# Altium PCB DAP-PCB-REV-4.PcbDoc (part 4 of 4)
Units mil, origin at the board's own origin, x right, y up, seen from the top; angles counter-clockwise.
Board outline 2559.06 x 2559.06 mil, 6 copper layers (L1 (SIG/PWR), L2 (GND), L3 (SIG), L4 (PWR), L5 (GND), L6 (SIG/PWR)), stack 64.976 mil thick; 309 components, 179 nets, 965 pads, 300 vias.
Unrouted connection lines stored in the file: 157.
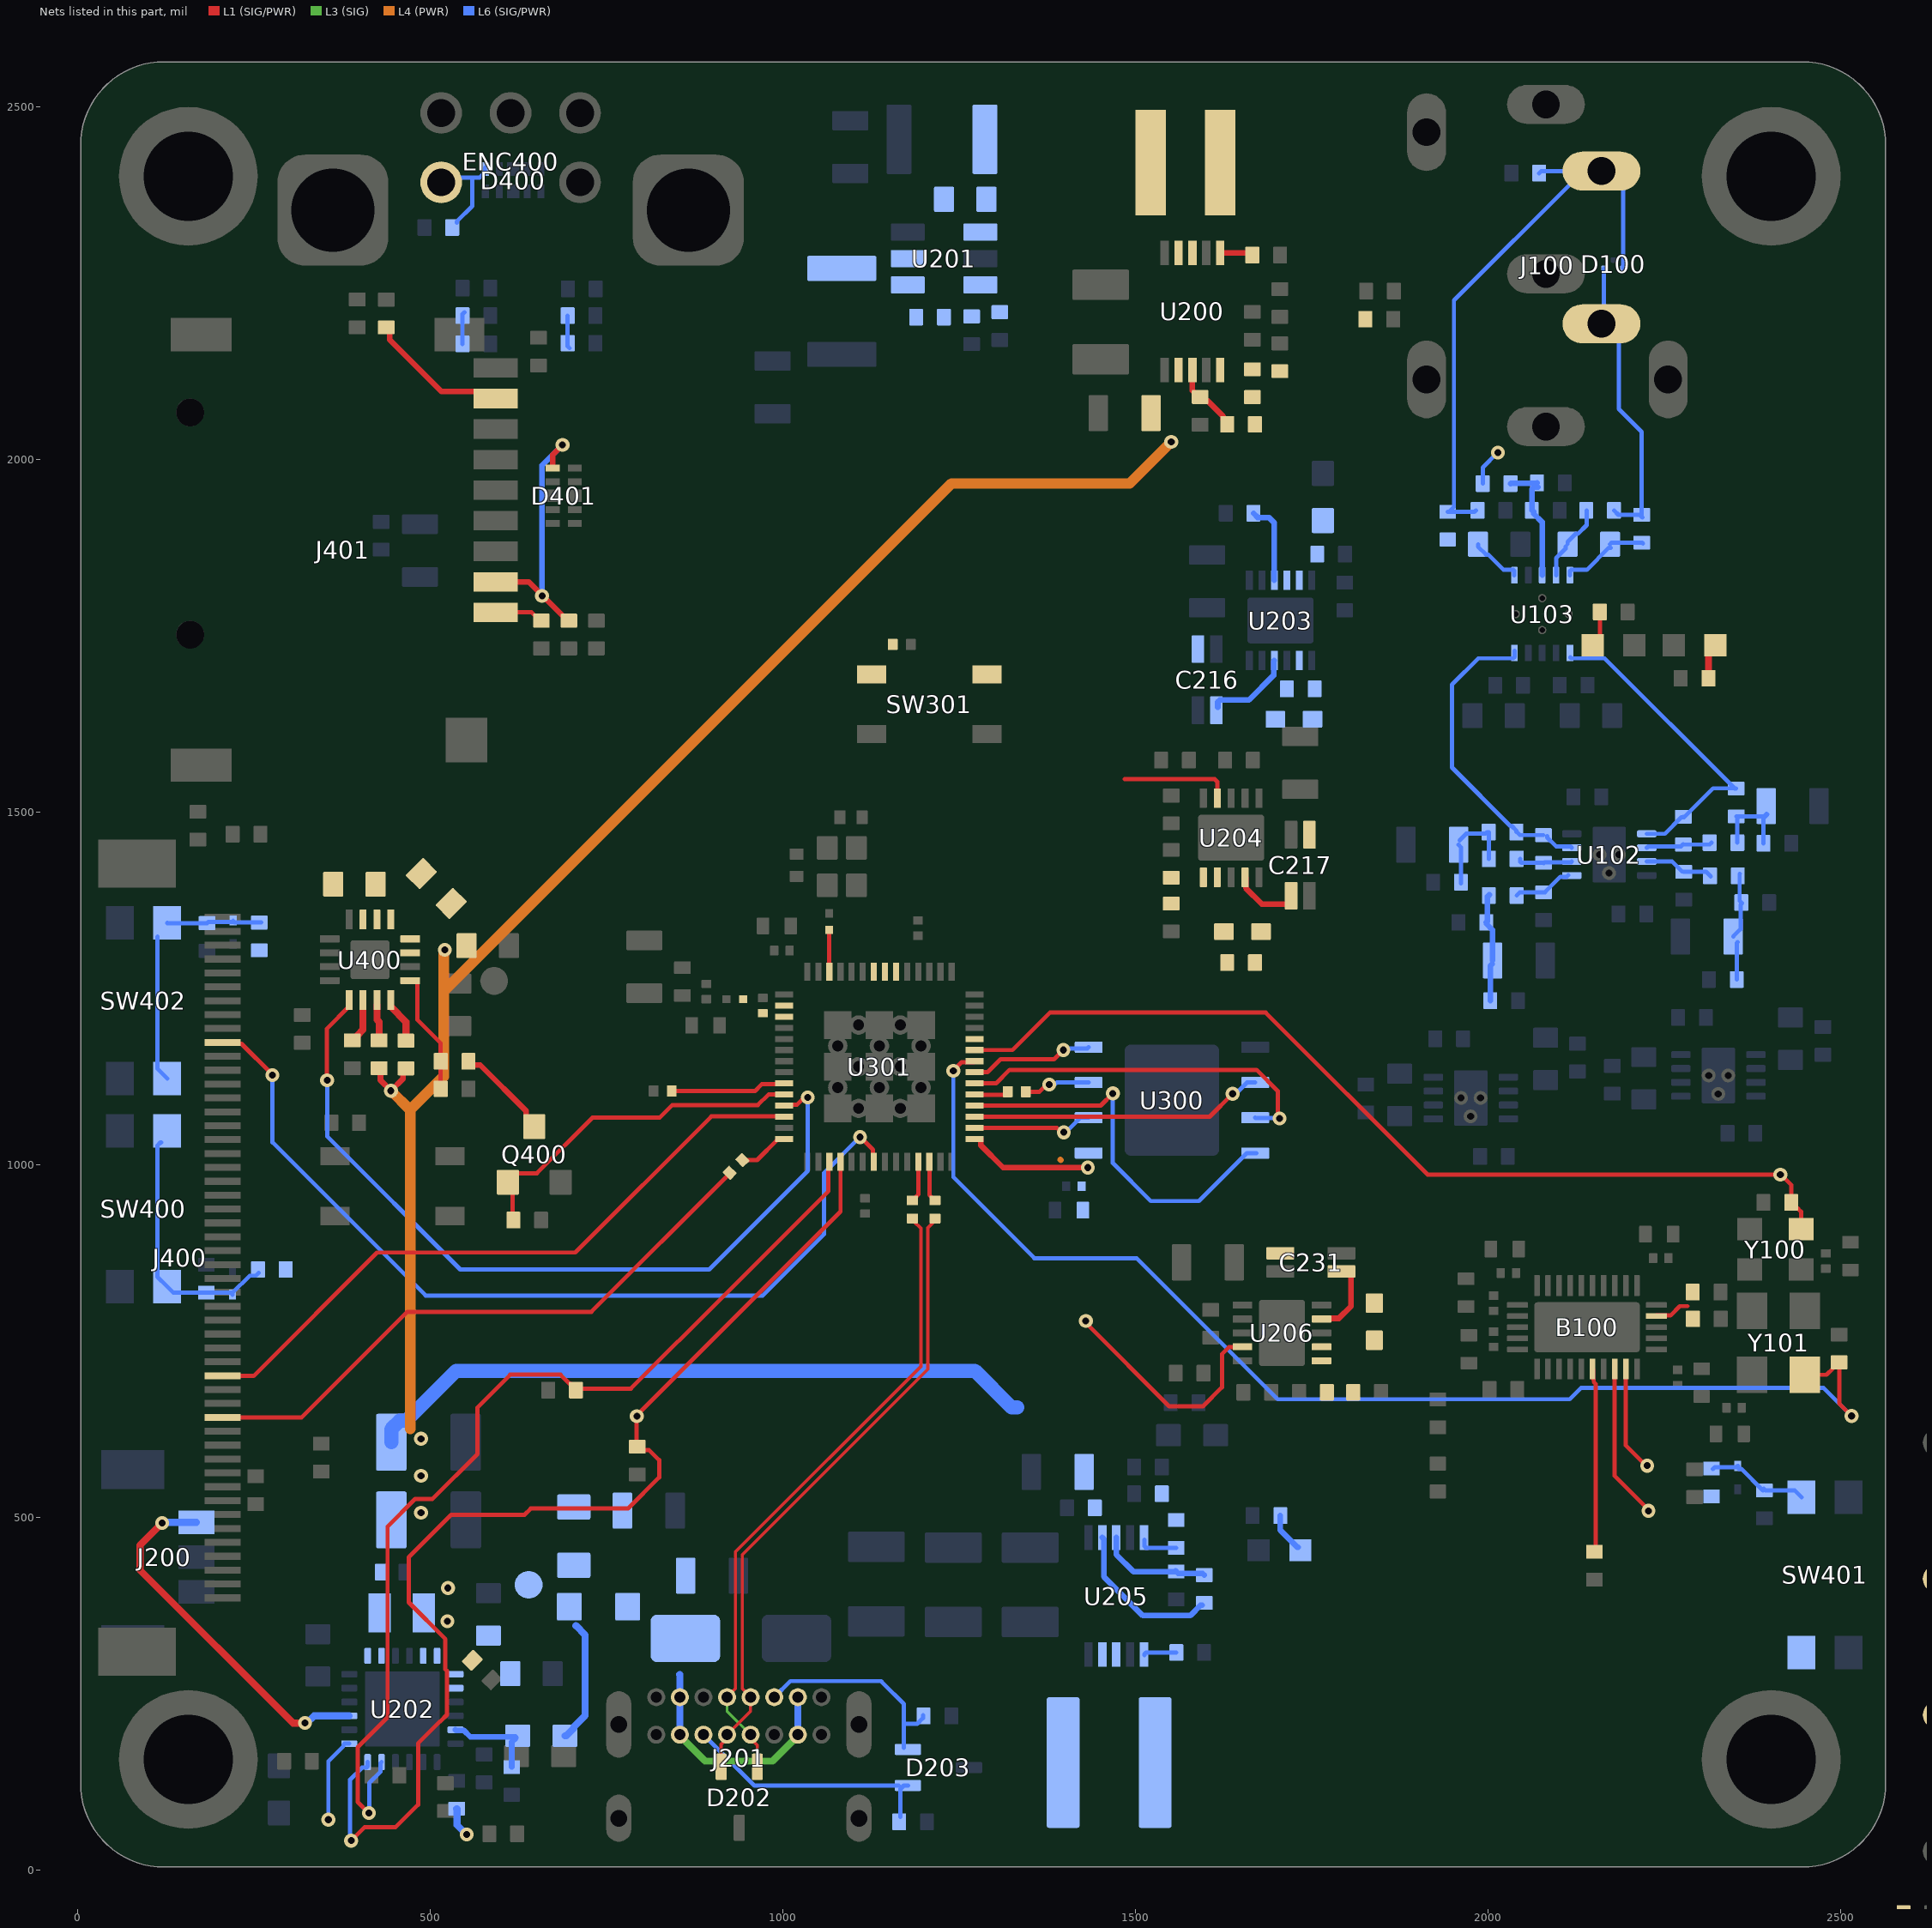
[diagram p6: the nets of this part, all layers, seen from the top]

## Via types
v1: diameter 19.68, hole 9.84, L1 (SIG/PWR) to L6 (SIG/PWR), tented both sides, 237 vias
v2: diameter 27.56, hole 13.78, L1 (SIG/PWR) to L6 (SIG/PWR), tented both sides, 56 vias
v3: diameter 49.21, hole 29.53, L1 (SIG/PWR) to L6 (SIG/PWR), 6 vias
v4: diameter 19.68, hole 9.84, L1 (SIG/PWR) to L6 (SIG/PWR), 1 vias

## Nets (pads, with @x,y where several pads share a name; then routed paths per layer and width w, separated by ;. In a path a pad name is that pad's centre, name@x,y a point inside that pad or via, vN(x,y) a via of type N, cw(c..) or ccw(c..) an arc to the next point about the centre after c; other vN are vias at no path point) (continued)
MOSI_LCD: J400.34 TP403.1 U301.12 | length 925.1
  L1 (SIG/PWR) w6: J400.34@225.02,701 250.02,701 425.02,876 706.02,876 899.02,1069 U301.12@997.65,1069
NetC118_2: C118.2 R122.2 U102.2 | length 94.6
  L6 (SIG/PWR) w5.98: U102.2@2225.15,1449.84 2227.08,1451.77 2273.77,1451.77 C118.2@2276.66,1454.66 ; C118.2@2277,1454.32 2314.32,1454.32 R122.2@2317,1457
NetC123_2: C123.2 R120.2 U102.6 | length 78.2
  L6 (SIG/PWR) w5.98: R120.2@2046,1434 2046,1429.85 2047.54,1428.31 C123.2@2078.76,1428.31 ; C123.2@2079.04,1428.04 2080.24,1429.24 2117.93,1429.24 U102.6@2118.85,1430.16
NetC124_2: C124.2 R117.1 U103.10 | length 125.8
  L6 (SIG/PWR) w5.98: U103.10@2116.31,1836.12 2116.31,1842.02 2118.04,1843.76 2140.2,1843.76 2171.44,1875 C124.2@2174,1875 ; C124.2@2173,1880 2175.32,1882.32 2218.68,1882.32 R117.1@2220,1881
NetC127_2: C127.2 R115.1 R116.2 R120.1 | length 140.7
  L6 (SIG/PWR) w5.98: C127.2@1958.4,1454 1961.68,1450.72 1961.68,1399.32 R116.2@1962,1399 ; C127.2@1960,1460 1960,1460.46 1969.19,1469.65 1996.65,1469.65 1999,1472 R115.1@2001.07,1472 ; R115.1@2001.19,1471.81 2001.19,1434.12 R120.1@2001.32,1434
NetC130_2: C130.2 R114.1 R121.2 R122.1 | length 124.2
  L6 (SIG/PWR) w5.98: R114.1@2352,1494.32 2391.32,1494.32 C130.2@2395,1498 ; R122.1@2353.68,1457 2353.68,1491.69 R114.1@2355,1493 ; R121.2@2390.76,1456 2390.76,1491.76 C130.2@2396,1497
NetC131_2: C131.2 R123.2 R124.1 R126.2 | length 149.2
  L6 (SIG/PWR) w7.99: R126.2@1997.68,1344 1999.5,1345.82 1999.5,1380.5 R124.1@2002,1383 ; R126.2@1998,1341.72 2006.6,1333.12 C131.2@2006.6,1290 ; R123.2@2003.32,1233 2003.32,1282.32 C131.2@2006,1285
NetC132_1: C132.1 R124.2 U102.5 | length 85.3
  L6 (SIG/PWR) w5.98: R124.2@2040.68,1382 2045.37,1386.68 C132.1@2078.95,1386.68 2080.91,1386.68 2102.77,1408.54 2111.54,1408.54 U102.5@2114,1411
NetC133_2: C133.2 R108.2 R128.2 U103.8 | length 172.6
  L6 (SIG/PWR) w7.99: R128.2@2032,1966 2032.5,1966.5 2069.13,1966.5 C133.2@2069.63,1967 ; R108.2@2062.32,1928 2062.32,1957.72 2065.6,1961 C133.2@2071,1961 ; R108.2@2065,1926 2065,1923.35 2076.94,1911.41 U103.8@2076.94,1836.12
NetC136_2: C136.2 R131.2 R132.1 R133.2 | length 148
  L6 (SIG/PWR) w5.98: C136.2@2347.8,1324 2358.13,1334.32 2358.13,1369.13 R133.2@2360.16,1371.16 ; R131.2@2352.68,1263 2352.68,1314.69 C136.2@2354,1316 ; R132.1@2357,1413 2356.78,1412.78 2356.78,1374.53 R133.2@2359.32,1372
NetC137_1: C137.1 R132.2 U102.3 | length 99.5
  L6 (SIG/PWR) w5.98: U102.3@2225.15,1430.16 2261.13,1430.16 2275.28,1416 C137.1@2277.57,1416 ; C137.1@2277.57,1415.68 2309.32,1415.68 R132.2@2316,1409
NetC138_2: C138.2 R134.1 U103.6 | length 75.2
  L6 (SIG/PWR) w6: C138.2@1985.94,1880 1985.94,1876.56 1997.21,1865.28 2000.66,1865.28 2022.19,1843.75 2035.84,1843.75 2037,1842.59 U103.6@2037,1836
NetC201_1: C201.1 L202.1 U201.5
NetC201_2: C201.2 L201.2 U201.1
NetC205_1: C205.1 R201.1 R204.2 U201.3
NetC212_1: C212.1 R213.1
NetC216_1: C216.1 C222.1 R232.1
NetC217_1: C217.1 C223.2 R233.1
NetC219_2: C219.2 D201.C FB200.1 J201.A4 J201.A9 J201.B4 J201.B9 | length 334
  L3 (SIG) w10: J201.B4@856.24,189 890.24,155 985.76,155 1021.66,190.9 J201.B9@1021.66,192.5
  L6 (SIG/PWR) w10: 854,278 854.34,277.66 J201.A9@854.34,245.65 ; J201.B4@854.34,192.5 854.34,243.34 J201.A9@855.5,244.5 ; J201.B9@1021.66,192.5 1021.66,243.66 J201.A4@1023,245
NetC221_2: C221.2 R227.1
NetC223_1: C223.1 R233.2 U204.7
NetC226_2: C226.2 R238.2
NetC231_1: C231.1 C233.2 R248.1
NetC233_1: C233.1 R248.2 U206.7
NetC302_2: C302.2 L300.1 U301.2 U301.3
NetC410_1: C410.1 U400.8
NetC410_2: C410.2 U400.9
NetC411_1: C411.1 U400.11
NetC411_2: C411.2 U400.10
NetD200_A: D200.A R206.1
NetD203_1: D203.1 J201.B5 R234.2 | length 358.7
  L6 (SIG/PWR) w5.98: J201.B5@887.8,192.5 959.9,120.41 D203.1@1164.41,120.41 ; R234.2@1167,76 1167,115.53 1171.88,120.41 D203.1@1177.69,120.41
NetD203_2: D203.2 J201.A5 R235.2 | length 303
  L6 (SIG/PWR) w5.98: J201.A5@988.2,245.65 1010.98,268.44 1139.56,268.44 1142.98,265.02 1172,236 1172,207.9 ; D203.2@1172,174 1172,207.9 ; R235.2@1199,220 1199,216.03 1190.87,207.9 1172,207.9
NetD204_A: D204.A R242.1
NetD205_C: D205.C R249.1
NetD206_A: D206.A R250.1
NetD207_A: D207.A R251.1 | length 50.8
  L1 (SIG/PWR) w10: R251.1@2312.68,1690 2312.68,1726.25 2320.43,1734 D207.A@2324,1734
NetD208_C: D208.C R252.1 | length 49.9
  L1 (SIG/PWR) w6: D208.C@2147,1740 2148.88,1740 2158.63,1749.75 R252.1@2158.63,1784
NetD209_A: D209.A R253.1 | length 56
  L6 (SIG/PWR) w8: R253.1@1705.69,503 1705.69,482.37 1730.05,458 D209.A@1731,458
NetD401_1: D401.1 J401.2 R416.1 | length 393.6
  L1 (SIG/PWR) w7.99: J401.2@593.12,1826.72 639.99,1826.72 693.72,1773 R416.1@698,1773 ; D401.1@674,1988.06 674,2007 v1@687,2020
  L6 (SIG/PWR) w7.99: v1(658.98,1806.73) 658.98,1991.73 690,2022.75 v1@690,2023
  other v1: 687.98,2020.73
NetJ401_1: J401.1 R417.1 | length 65.8
  L1 (SIG/PWR) w6: J401.1@593.12,1783.42 644.3,1783.42 653.72,1774 R417.1@655,1774
NetJ401_8: J401.8 R418.1 | length 195.6
  L1 (SIG/PWR) w7.99: R418.1@438,2187.32 442.81,2182.51 442.81,2170.19 516.65,2096.35 572.65,2096.35 J401.8@584,2085
NetQ400_1: Q400.1 R425.2 U301.10 | length 499.7
  L1 (SIG/PWR) w6: Q400.1@610.6,975.63 610.6,975.71 623.35,988.46 651.73,988.46 730.27,1067 825.64,1067 843.64,1085 965,1085 980,1100 U301.10@993,1100 ; Q400.1@613.13,982.13 617,978.26 R425.2@617,918
NetQ400_3: Q400.3 R423.1 | length 137.9
  L1 (SIG/PWR) w8: R423.1@554.69,1147 559.99,1141.69 571.31,1141.69 636.65,1076.35 636.65,1065.72 Q400.3@648,1054.37
NetR119_1: R119.1
NetR128_1: R128.1 | length 52.9
  L6 (SIG/PWR) w6: R128.1@1992.63,1966 1992.63,1988.63 v1(2014,2010)
NetR203_1: R203.1 R303.2
NetR204_1: R204.1 U201.4
NetR207_2: R207.2 U200.1 | length 45.9
  L1 (SIG/PWR) w7.99: U200.1@1620.37,2292.95 1660.15,2292.95 1663,2290.11 R207.2@1663,2288
NetR219_1: R219.1 R226.2 U203.3 | length 116.7
  L6 (SIG/PWR) w7.99: R219.1@1667.68,1924 1667.68,1923.76 1673.53,1917.92 1689.52,1917.92 1697.14,1910.29 U203.3@1697.14,1828.91
NetR238_1: R238.1 U205.10 | length 55.2
  L6 (SIG/PWR) w6: U205.10@1513,469 1513,459.83 1515.51,457.32 R238.1@1558,457.32
NetR239_2: R239.2 U205.1 | length 47.9
  L6 (SIG/PWR) w6: U205.1@1513,305 1513,306.63 1515.37,309 R239.2@1558.32,309
NetR302_2: R302.2 SW301.1 SW301.2
NetR304_1: R304.1 U301.25 | length 54.9
  L1 (SIG/PWR) w6: R304.1@1184,949.8 1184.98,949.8 1188.87,953.69 1188.87,954.67 1192.37,958.16 U301.25@1192.37,1000.63
NetR305_1: R305.1 U301.26 | length 53.9
  L1 (SIG/PWR) w6: U301.26@1208.11,999.89 1208.11,957.68 1211.13,954.67 1211.13,953.69 1215.02,949.8 R305.1@1216,949.8
NetR306_1: R306.1 U301.14 | length 68.5
  L1 (SIG/PWR) w6: R306.1@943.05,1007.05 943.74,1006.35 949.24,1006.35 949.94,1007.05 963.95,1007.05 992.91,1036 U301.14@999,1036
NetR307_1: R307.1 U301.9 | length 164.1
  L1 (SIG/PWR) w6: R307.1@842.8,1105 961,1105 970.44,1114.44 1001.07,1114.44 U301.9@1002.41,1115.78
NetR409_1: R409.1
NetR410_1: R410.1
NetR411_1: R411.1
NetR420_2: R420.2 U400.3 | length 51.6
  L1 (SIG/PWR) w10: U400.3@425,1227 425,1205.76 428,1202.76 R420.2@428,1176.69
NetR421_2: R421.2 U400.4 | length 56.3
  L1 (SIG/PWR) w10: U400.4@445,1224 466,1203 R421.2@466,1176.37
NetR422_2: R422.2 U400.2 | length 55.7
  L1 (SIG/PWR) w10: R422.2@390,1176.69 391.97,1176.69 396.81,1181.53 396.81,1183.5 405,1191.69 U400.2@405,1225
NetR423_2: R423.2 R424.2 U400.5 | length 167.2
  L1 (SIG/PWR) w6: U400.5@480.96,1261 482.41,1259.55 482.41,1205.59 515.32,1172.69 R423.2@515.32,1147 R424.2@515.32,1108
NetU301_11: U301.11 U400.1 | length 1156.3
  L1 (SIG/PWR) w6: v1@354,1124 354,1193.45 385.47,1224.92 U400.1@385.47,1234 ; U301.11@1002.41,1084.28 1003.74,1085.61 1020.61,1085.61 v1@1030,1095
  L6 (SIG/PWR) w6: v1(354.32,1120.09) 354.32,1040.68 543,852 896,852 1035.62,991.62 1035.62,1095.62 v1@1036,1096
  other v1: 1035.62,1095.84
OUTS_1: C216.4 U203.10 | length 123.6
  L6 (SIG/PWR) w7.99: C216.4@1617,1649 1617,1656.46 1619.85,1659.32 1661.32,1659.32 1696.22,1694.22 1696.22,1714.17 U203.10@1697.14,1715.09
OUTS_2: C231.4 U206.9 | length 96.9
  L1 (SIG/PWR) w8: U206.9@1764.1,781.68 1765.02,782.61 1788.61,782.61 1806,800 1806,846 C231.4@1807,847
OUTS_3: C217.4 U204.9 | length 90.3
  L1 (SIG/PWR) w7.99: U204.9@1655.68,1407.9 1656.61,1406.97 1656.61,1392.75 1679.36,1370 C217.4@1722,1370
PG_DAC_LDO+: D204.C U206.4 | length 332.5
  L1 (SIG/PWR) w6: v1@1430.51,775.49 1548,658 1596,658 1623,685 1623,732 1633.06,742.06 1651.65,742.06 U206.4@1651.9,742.32
  other v1: 1429.96,779.1
PG_LDO+: R223.1 U204.4 U301.38 | length 156.2
  L1 (SIG/PWR) w6: 1485,1547 1612.8,1547 1616.32,1543.49 U204.4@1616.32,1520.1
PG_LDO-: R241.1 U203.4
PGFB_DAC_LDO+: R243.1 R245.2 U206.6
PGFB_LDO+: R222.1 R228.2 U204.6
PGFB_LDO-: R220.1 R224.2 U203.5
PMID_BQ: C200.2 U202.20
POWER_SW: D402.C R401.2 R409.2 SW401.1 SW401.3 | length 146.6
  L6 (SIG/PWR) w6: R409.2@2319,569 2321.61,571.61 2352.08,571.61 D402.C@2354,573.54 ; D402.C@2355,573.54 2355,570.37 2355.92,569.45 2359.27,569.45 R401.2@2390.03,538.68 ; R401.2@2391,541 2393.32,538.68 2435.09,538.68 SW401.3@2444.54,529.24
RESET: J400.10 U301.21 | length 1292.5
  L1 (SIG/PWR) w6: J400.10@206,1173.83 207.92,1171.91 232.89,1171.91 276,1128.8 v1@276,1127 ; v1@1112,1038 1128.04,1021.96 1128.04,1005.89 U301.21@1129.37,1004.56
  L6 (SIG/PWR) w6: v1(276.79,1127.6) 276.79,1032.21 494,815 972,815 1059,902 1059,988.8 1107.2,1037 v1@1110,1037
  other v1: 1109.79,1039.6
RESETB_DAC: B100.21 R111.2 | length 257
  L1 (SIG/PWR) w6: B100.21@2148.25,711 2149.19,710.06 2149.19,696.6 2150.06,695.72 2150.06,692.37 2153,689.43 R111.2@2153,456
RIGHT_EAR: C124.1 R125.1 U103.9 | length 107.4
  L6 (SIG/PWR) w6: U103.9@2096.62,1836.12 2096.62,1860.24 2110,1873.61 C124.1@2110,1877 ; C124.1@2112.94,1880.13 2112.94,1883.44 2124.21,1894.72 2127.53,1894.72 2140,1907.19 R125.1@2140,1928
RING: D100.3 J100.3 R117.2 R125.2 | length 372.6
  L6 (SIG/PWR) w6: D100.3@2164.61,2271.09 2164.61,2219.39 J100.3@2167,2217 ; J100.3@2177,2177 2178.33,2177 2185.56,2169.78 2185.56,2071.57 2218,2039.13 R117.2@2218,1921.69 ; R125.2@2178.68,1928 2185,1921.69 2215.32,1921.69 R117.2@2219,1918
SCL_BQ: B100.23 R208.1 TP200.1 U202.6 U301.18 | length 1831.8
  L1 (SIG/PWR) w6: v1(388.37,42.33) 407.53,61.49 451.55,61.49 483.27,93.21 483.27,180.27 514.82,211.82 515.18,211.82 524.15,220.78 524.15,282.85 522,285 522,328.01 470,380.01 470,444 530.26,504.26 634.26,504.26 643,513 780.79,513 825,557.21 825,581.72 810.86,595.86 802.81,595.86 801,597.67 R208.1@801,605.72 ; R208.1@798,605 795.53,605 793,607.53 793,645 1082.13,934.13 U301.18@1082.13,1004.56 ; B100.23@2179.75,711 2179.75,559.25 v1@2226,513
  L6 (SIG/PWR) w6: v1@387,47.15 387,128.92 403.91,145.82 410.06,145.82 411.79,147.55 U202.6@411.79,153.7
  other v1: 2227.71,509.83 793.36,644.12
SCL_LCD: J400.37 R306.2 TP405.1 | length 862.2
  L1 (SIG/PWR) w6: J400.37@206,642.34 318.34,642.34 468,792 729,792 R306.2@925,988
SDA_BQ: B100.24 R211.1 TP202.1 U202.5 U301.17 | length 1574.1
  L1 (SIG/PWR) w6: v1(413.37,81.33) 397.47,97.23 397.47,174.47 440,217 440,487.61 479.23,526.84 503.84,526.84 567.5,590.5 567.5,656.5 613.81,702.81 685.19,702.81 698.19,689.81 700.16,689.81 707,682.97 R211.1@707,681 ; R211.1@710.89,679.89 710.89,680.05 713.84,683 785,683 919.83,817.83 1065.05,963.05 1065.05,1003.22 U301.17@1066.38,1004.56 ; B100.24@2195.5,711 2195.5,602.5 v1@2223,575
  L6 (SIG/PWR) w6: v1@414,83.31 414,124 429.75,139.75 429.75,151.98 U202.5@431.47,153.7
  other v1: 2225.71,573.83
SELECT: D400.1 ENC400.5 R412.2 TP402.1 U301.48 | length 147.6
  L6 (SIG/PWR) w5.98: ENC400.5@516,2393 522.83,2399.83 560,2399.83 ; R412.2@538,2336 538,2337.28 560,2359.28 560,2399.83 ; D400.1@578,2414 578,2407.26 570.57,2399.83 560,2399.83
SET_LDO-: C222.2 R232.2 U203.8
SHDN_BB_3.3: C230.2 R237.2 U205.8 | length 162.6
  L6 (SIG/PWR) w8: U205.8@1473,471.95 1473.26,471.69 1473.26,447.74 1497.32,423.68 C230.2@1558,423.68 ; C230.2@1557,425 1560.82,421.18 1595.5,421.18 R237.2@1598,418.68
SHDN_BB_3.9: C213.2 R203.2 U200.8 | length 98.2
  L1 (SIG/PWR) w7.99: U200.8@1581,2127.05 1581,2097.72 C213.2@1590.72,2088 ; C213.2@1592,2088.69 1597.85,2082.84 1603.16,2082.84 1624.47,2061.53 1624.47,2057.81 1627.28,2055 R203.2@1631,2055
SPI_CS0: U300.1 U301.32 | length 556.2
  L1 (SIG/PWR) w6: U301.32@1272.09,1084.28 1450.99,1084.28 v1(1468.23,1101.52)
  L6 (SIG/PWR) w6: v1(1468.23,1101.52) 1468.23,1002.77 1522,949 1590.3,949 1658.3,1017 U300.1@1672,1017
SPI_D: U300.5 U301.35 | length 176.5
  L1 (SIG/PWR) w6: U301.35@1272.09,1131.52 1290.52,1131.52 1309,1150 1385,1150 v1(1398,1163)
  L6 (SIG/PWR) w6: v1(1398,1163) 1400,1165 1431.89,1165 U300.5@1433.89,1167
SPI_HD: U300.7 U301.30 | length 169.6
  L1 (SIG/PWR) w6: U301.30@1272.09,1052.78 1388.73,1052.78 1393.52,1048 v1@1401,1048
  L6 (SIG/PWR) w6: v1@1403.08,1048 1422.08,1067 U300.7@1433.89,1067
  other v1: 1398.83,1046.39
SPI_Q: U300.2 U301.34 | length 522.3
  L1 (SIG/PWR) w6: U301.34@1272.09,1115.78 1302.56,1115.78 1321.78,1135 1672,1135 1702,1105 v1@1702,1068.19
  L6 (SIG/PWR) w6: U300.2@1670.11,1067 1670.51,1066.6 1704.6,1066.6 v1@1705,1067
  other v1: 1704.71,1066.21
SPI_WP: U300.3 U301.31 | length 418.1
  L1 (SIG/PWR) w6: U301.31@1272.09,1068.53 1605.53,1068.53 v1(1638,1101)
  L6 (SIG/PWR) w6: v1(1638,1101) 1640.62,1103.62 1644.92,1103.62 1658.3,1117 U300.3@1670.11,1117
SPICLK: R308.2 U301.33 | length 47.3
  L1 (SIG/PWR) w6: U301.33@1272.09,1100.03 1272.6,1099.51 1318.51,1099.51 R308.2@1319,1100
SPICLK_FL: R308.1 U300.6 | length 97.6
  L1 (SIG/PWR) w6: R308.1@1344.8,1104 1364.3,1104 1374.3,1114 v1(1378,1114)
  L6 (SIG/PWR) w6: v1@1377,1109 1380.7,1109 1388.7,1117 U300.6@1433.89,1117
STAT_BQ: D200.C U202.7 | length 124
  L6 (SIG/PWR) w6: v1(356,72) 356,154.89 377.29,176.17 377.29,178.06 379.01,179.79 U202.7@385.7,179.79
SUMM_L: C123.1 R115.2 U102.7 U103.5 | length 444
  L6 (SIG/PWR) w5.98: U103.5@2038,1729 2038,1720.41 2035.83,1718.24 1986.24,1718.24 1949,1681 1949,1563.44 2031.62,1480.82 2033.59,1480.82 2040.44,1473.97 R115.2@2040.44,1472 ; R115.2@2041,1472 2045.32,1467.68 C123.1@2078.76,1467.68 ; C123.1@2084,1466 2084,1464.41 2096.64,1451.77 2116.92,1451.77 U102.7@2118.85,1449.84
SUMM_R: C118.1 R114.2 U102.1 U103.1 | length 466.9
  L6 (SIG/PWR) w5.98: U103.1@2117,1720 2117,1719.28 2118.04,1718.24 2165.47,1718.24 2350.03,1533.69 R114.2@2352,1533.69 ; U102.1@2225.15,1469.53 2250.87,1469.53 2274.35,1493 C118.1@2278,1493 ; C118.1@2277,1493.69 2278.97,1493.69 2319.28,1534 R114.2@2352,1534
SW1_BB_3.3: L204.1 U205.3
SW1_BB_3.9: L200.1 U200.3
SW2_BB_3.3: L204.2 U205.4
SW2_BB_3.9: L200.2 U200.4
SW_BQ: C207.1 L203.1 U202.17 U202.18
  other v1: 524.66,353.42 525.66,400.42
SYS: C203.2 C208.2 C209.2 C210.2 C224.2 C234.2 C412.2 L203.2 R206.2 R237.1 R420.1 R421.1 TP204.1 U200.7 U202.13 U202.14 U205.7 U400.7 | length 3348.9
  L1 (SIG/PWR) w7.99: R420.1@428,1137.32 429.9,1135.41 429.9,1120.17 v1(444.76,1105.31) 462,1122.55 R421.1@462,1131
  L4 (PWR) w15: v1(444.76,1105.31) 472,1078.07 ; 472,626 472,1078.07 ; v1@519.47,1303.47 520.1,1302.84 520.1,1300.79 519.47,1300.16 519.47,1246 ; v1(1551,2025) 1492,1966 1239.47,1966 519.47,1246 ; 472,1078.07 519.47,1125.54 519.47,1246
  L6 (SIG/PWR) w7.99: U205.7@1453.32,471.95 1455.32,469.94 1455.32,416.68 1510.69,361.31 1578.03,361.31 1592.72,376 R237.1@1595,376
  L6 (SIG/PWR) w20: C208.2@445.2,607 445.2,625.7 456.86,637.35 466.2,637.35 537.18,708.33 1272.67,708.33 1324.67,656.33 1332.67,656.33
  other v1: 487.45,507 487.45,559.5 487.45,612 521,1305
TIP: D100.2 J100.2 R127.2 R129.2 R134.2 | length 756.8
  L6 (SIG/PWR) w6: R127.2@1983,1928 1981,1926 R134.2@1943,1926 1944.97,1926 1951.81,1932.84 1951.81,2225.81 J100.2@2125,2399 ; R129.2@2072.68,2406 2075.68,2409 2114,2409 J100.2@2116,2407 ; D100.2@2191.39,2271.09 2191.94,2271.65 2191.94,2386.31 2195.63,2390 J100.2@2196,2390
TRI_STATE_22: R106.2 U301.37 Y100.1 | length 1349.7
  L1 (SIG/PWR) w6: U301.37@1272.09,1163.02 1326.02,1163.02 1379,1216 1685,1216 1914.65,986.35 2411.65,986.35 v1@2412,986 ; v1@2414,988 2430,972 R106.2@2430,947 ; R106.2@2431,947 2431,944.03 2436.84,938.19 2439.65,938.19 2444,933.83 Y100.1@2444,909.09
  other v1: 2414.56,986.35
TRI_STATE_24: R107.2 U301.36 Y101.1 | length 1751.3
  L1 (SIG/PWR) w6: v1@1244,1136 1253.94,1145.94 1270.76,1145.94 U301.36@1272.09,1147.27 ; Y101.1@2449.39,702.72 2480.05,702.72 2489.19,711.86 2489.19,713.47 2491.72,716 R107.2@2498,716 ; R107.2@2498,720.32 R107.2@2498,716 ; v1@2515,645 2498,662 R107.2@2498,716
  L6 (SIG/PWR) w6: v1@1237,1135 1242.13,1129.87 1242.13,982.87 1357,868 1502,868 1702,668 2116,668 2132,684 2475.92,684 v1(2515.56,644.35)
  other v1: 1242.13,1133.67
TS: J200.3 R214.1 R215.2 U202.9 | length 559.3
  L1 (SIG/PWR) w10: v1(120.47,492.51) 89,461.05 89,426 306,209 v1(323,209)
  L6 (SIG/PWR) w10: v1@122.43,493.43 J200.3@169,493.43 ; v1(323,209) 325.62,209 335.78,219.16 U202.9@385.7,219.16 ; R214.1@538,87.63 538.5,87.13 538.5,64.5 v1(552,51)
U0RXD: C405.2 R408.1 TP302.1 U301.50 | length 46.1
  L6 (SIG/PWR) w6: C405.2@546.32,2164 546.32,2206.32 R408.1@549,2209
U0TXD: C404.2 R400.2 TP303.1 U301.49 | length 47.1
  L6 (SIG/PWR) w6: R400.2@695.32,2204 695.32,2160.69 C404.2@698,2158
USB_D_N: D202.1 J201.A7 J201.B7 R304.2 | length 903.4
  L1 (SIG/PWR) w4.75: J201.A7@921.27,245.65 921.27,246.17 933.13,258.03 933.13,451.8 1196,714.67 1196,811.62 1196,910.19 1185.98,920.2 R304.2@1185,920.2 ; J201.B7@955,188 955,186.6 964.18,177.42 D202.1@964.18,147
  L3 (SIG) w3.98: J201.A7@921.27,243.73 921.27,225.97 J201.B7@954.73,192.5
USB_D_P: D202.2 J201.A6 J201.B6 R305.2 | length 898.4
  L1 (SIG/PWR) w4.75: D202.2@913,147 913,178.6 920,185.6 J201.B6@920,187 ; J201.B6@921.27,192.5 954.5,225.74 954.5,237.5 J201.A6@952,240 ; J201.A6@954.73,245.65 954.73,246.17 942.87,258.03 942.87,447.76 1205.75,710.64 1205.75,815.66 1205.75,910.94 1215.02,920.2 R305.2@1216,920.2
VC_BB_3.9: C212.2 U200.10
VDD_SPI: C311.2 C312.2 U300.8 U301.29 | length 181.8
  L1 (SIG/PWR) w7.99: U301.29@1272.09,1037.04 1280.56,1037.04 1280.89,1036.7 1280.89,1028.24 1312.73,996.39 1430.39,996.39 v1@1431,997
  L4 (PWR) w7.99: 1393.88,1007.67 1393.88,1007.59 1394.44,1007.03
  other v1: 1432.83,996.39
VDPM_BQ: R202.1 R205.2 U202.23 | length 132.7
  L6 (SIG/PWR) w8: U202.23@536.3,199.47 537.02,198.75 547.93,198.75 557.38,189.29 R202.1@621,189.29 ; R205.2@616,146.68 616,182 R202.1@622,188
VOLUME+_SW: D403.C R404.2 R410.2 SW400.1 SW400.3 | length 361.1
  L6 (SIG/PWR) w6: SW400.1@119,1032 117.91,1032 113.53,1027.61 113.53,841.7 SW400.3@127.46,827.76 135.91,819.32 R404.2@183,819.32 218.08,819.32 D403.C@220,817.39 ; D403.C@220,816 220,818.63 244.56,843.19 253.19,843.19 R410.2@257,847
VOLUME-_SW: D404.C R406.2 R411.2 SW402.1 SW402.3 | length 343.2
  L6 (SIG/PWR) w6: SW402.1@114,1324 113.53,1323.53 113.53,1136.7 SW402.3@127.46,1122.76 ; SW402.1@127.46,1343.24 127.7,1343 R406.2@184,1343 185.77,1344.77 D404.C@221.23,1344.77 ; D404.C@221,1346.54 221,1345.92 222.92,1344 R411.2@261,1344
VUSB: C202.2 FB200.2 R202.2 R227.2 TP201.1 U202.19 | length 174.4
  L6 (SIG/PWR) w10: R202.2@691.46,191 693.43,191 704.18,201.75 704.18,203.72 720,219.54 720,334 707,347
XI: B100.29 R104.2 R105.1 | length 50.1
  L1 (SIG/PWR) w6: B100.29@2238.8,785.8 2239.74,786.74 2258.74,786.74 2272,800 2283,800
XTAL_P: L301.2 U301.54 | length 59.2
  L1 (SIG/PWR) w6: U301.54@1066.38,1274.24 1066.19,1274.43 1066.19,1332.19 L301.2@1067,1333
pads on no net: B100.4 B100.5 B100.6 B100.7 B100.26 B100.28 D400.4 D400.6 D400.7 D400.9 D400.10 D401.6 D401.7 D401.9 D401.10 ENC400.6 ENC400.7 J100.5 J201.A8 J201.B8 J400.33 J400.39 J400.44 J400.45 J400.46 J400.47 J400.S1 J400.S2 J401. U203.7 U301.1 U301.39 U301.40 U301.41 U301.42 U301.43 U301.44 U301.45 U301.47 U301.51 U301.52
copper on no net:
  other v3: 2423.87,419 2532.13,419 39.87,938 148.13,938 39.87,1233 148.13,1233

## Polygon pours and split planes (outlines as drawn)
+3V3_ANALOG on L1 (SIG/PWR) "NONET_L06_P-001" (solid, pour order 187): 2353,728 2396,728 2396,587 2353,587 2353,722
GND on L1 (SIG/PWR) "NONET_L06_P-001" (solid, pour order 229): 2254.07,796.86 2254.07,804.86 2211.07,804.86 2211.07,796.86 2244.07,796.86
+3V3_DIG on L1 (SIG/PWR) "NONET_L06_P-001" (solid, pour order 226): 625,1927 625,1899 522,1899 522,1927
+3V3_DIG on L1 (SIG/PWR) "NONET_L06_P-001" (solid, pour order 225): 641,1743 753,1743 753,1693 641,1693 641,1722
+3V3_DIG on L1 (SIG/PWR) "NONET_L06_P-001" (solid, pour order 224): 1055,1261 1055,1315 1013,1357 1003,1357 1003,1261
GND on L1 (SIG/PWR) "NONET_L06_P-001" (solid, pour order 221): 2160.34,712.45 2168.34,712.45 2168.34,755.45 2160.34,755.45 2160.34,722.45
GND on L1 (SIG/PWR) "NONET_L06_P-001" (solid, pour order 220): 2027.45,805.66 2027.45,797.66 2070.45,797.66 2070.45,805.66 2037.45,805.66
GND on L1 (SIG/PWR) "NONET_L06_P-001" (solid, pour order 219): 2027,758 2027,750 2070,750 2070,758 2037,758
PGFB_LDO+ on L1 (SIG/PWR) "NONET_L06_P-001" (solid, pour order 217): 1538,1360 1602,1360 1602,1423 1538,1423
GND on L1 (SIG/PWR) "NONET_L06_P-001" (solid, pour order 216): 2017,670 1955,670 1955,733 1986,733 2002,749 2017,749
GND on L1 (SIG/PWR) "NONET_L06_P-001" (solid, pour order 215): 1951,824 1951,899 2026,899 2026,809 2002,809 1987,824
XI on L1 (SIG/PWR) "NONET_L06_P-001" (solid, pour order 214): 2281,832 2281,770 2300,770 2300,832 2295,832
SW_BQ on L1 (SIG/PWR) "SW_BQ_L01_P117" (solid, pour order 117): 549,282 505,326 505,414 532,414 577,369 577,299 560,282
BOOT_BQ on L1 (SIG/PWR) "BOOT_BQ_L01_P118" (solid, pour order 118): 584,291 569,276 569,254 609,214 635,214 635,260 604,291
SW2_BB_3.9 on L1 (SIG/PWR) "SW2_BB_3.9_L01_P019" (solid, pour order 19): 1567.4,2275.51 1555.4,2275.51 1555.4,2316.51 1529.4,2342.51 1458.4,2342.51 1458.4,2503 1559,2503 1559,2346.91 1567.4,2338.51
SW1_BB_3.9 on L1 (SIG/PWR) "SW1_BB_3.9_L01_P020" (solid, pour order 20): 1575,2274 1587,2274 1587,2317 1611,2341 1684,2341 1684,2503 1587,2503 1587,2349 1575,2337
+3V9 on L1 (SIG/PWR) "+3V9_L01_P021" (solid, pour order 21): 1399.95,2204 1548,2204 1548,2109 1399.95,2109
SYS on L1 (SIG/PWR) "SYS_L01_P022" (solid, pour order 22): 1567.15,2010 1567.15,2144.92 1555.15,2144.92 1555.15,2102.92 1553.15,2100.92 1508,2100.92 1508,2010
VC_BB_3.9 on L1 (SIG/PWR) "VC_BB_3.9_L01_P023" (solid, pour order 23): 1678,2145 1614,2145 1614,2109 1678,2109
NetC212_1 on L1 (SIG/PWR) "NETC212_1_L01_P024" (solid, pour order 24): 1691,2135 1691,2111 1680,2100 1653,2100 1653,2080 1717,2080 1717,2135
FB_BB_3.9 on L1 (SIG/PWR) "FB_BB_3.9_L01_P080" (solid, pour order 80): 1717,2153 1717,2212 1690,2212 1690,2199 1674,2183 1647,2183 1647,2153
GND on L1 (SIG/PWR) "NONET_L06_P-001" (solid, pour order 198): 1676,805 1676,827 1622,827 1622,920 1677,920 1677,858 1728,858 1728,805 1680,805
+3V3_DAC on L1 (SIG/PWR) "NONET_L06_P-001" (solid, pour order 196): 2073,814 2061,814 2034,841 2034,895 2073,895 2073,843
+LED on L1 (SIG/PWR) "+LED_L01_P036" (solid, pour order 36): 457.66,1286 615.66,1286 615.66,1240 526.66,1240 490.66,1276 457.66,1276
+3V3_DIG on L1 (SIG/PWR) "NONET_L06_P-001" (solid, pour order 195): 2056.42,774.19 1926,774.19 1926,740.19 1979.19,740.19 1996.19,757.19 2018.42,757.19 2018.42,766.19 2056.42,766.19 2056.42,769.19
+3V3_DAC on L1 (SIG/PWR) "NONET_L06_P-001" (solid, pour order 193): 2057,782 1926,782 1926,816 1984,816 2001,799 2019,799 2019,790 2057,790 2057,787
GND on L1 (SIG/PWR) "NONET_L06_P-001" (solid, pour order 192): 2250,850 2300,850 2306,856 2306,879 2271,914 2250,914 2250,874
+3V3_ANALOG on L1 (SIG/PWR) "NONET_L06_P-001" (solid, pour order 190): 2426,836 2545,836 2545,861 2462,861 2462,867 2426,867 2426,854
GND on L1 (SIG/PWR) "NONET_L06_P-001" (solid, pour order 189): 2322,694 2346,694 2346,592 2292,592 2292,619 2322,649
GND on L1 (SIG/PWR) "NONET_L06_P-001" (solid, pour order 188): 2262,694 2317,694 2317,655 2286,624 2262,624
+3V3_DAC on L1 (SIG/PWR) "NONET_L06_P-001" (solid, pour order 186): 2261,703 2315,703 2315,758 2224,758 2224,750 2261,750
+3V3_DAC on L1 (SIG/PWR) "NONET_L06_P-001" (solid, pour order 185): 2207,814 2242,814 2242,914 2207,914 2207,838
+3V3_DIG on L1 (SIG/PWR) "NONET_L06_P-001" (solid, pour order 184): 927,1225 927,1241 880,1241 861,1260 773,1260 773,1225 890,1225
NetC302_2 on L1 (SIG/PWR) "NONET_L06_P-001" (solid, pour order 183): 937,1246 953,1246 953,1222 982,1222 990,1230 1015,1230 1015,1206 937,1206
GND on L1 (SIG/PWR) "NONET_L06_P-001" (solid, pour order 180): 1124,898 1124,937 1110,937 1110,898 1116,898
+3V3_DIG on L1 (SIG/PWR) "+3V3_DIG_L01_P072" (solid, pour order 72): 1197,1318 1199,1318 1199,1331 1185,1331 1185,1318 1187.93,1318 1187.93,1261.07 1197,1261.07
PGFB_DAC_LDO+ on L1 (SIG/PWR) "NONET_L06_P-001" (solid, pour order 154): 1750,728 1750,661 1820,661 1820,728 1770,728
ILIM_DAC_LDO+ on L1 (SIG/PWR) "NONET_L06_P-001" (solid, pour order 153): 1666,658 1666,728 1638,728 1638,658
EN_DAC_LDO+ on L1 (SIG/PWR) "EN_DAC_LDO+_L01_P152" (solid, pour order 152): 1665.78,766.59 1595.78,766.59 1575.78,746.59 1575.78,684.59 1612.78,684.59 1612.78,737.78 1631.59,756.59 1665.78,756.59
+3V9 on L1 (SIG/PWR) "NONET_L06_P-001" (solid, pour order 150): 1666,777 1666,819 1615,819 1615,919 1534,919 1534,777
+3V3_DAC on L1 (SIG/PWR) "NONET_L06_P-001" (solid, pour order 149): 1784,796 1796,808 1796,833 1765,833 1765,866 1812,866 1812,884 1735,884 1735,796
NetC231_1 on L1 (SIG/PWR) "NONET_L06_P-001" (solid, pour order 148): 1899,777 1899,920 1684,920 1684,865 1727,865 1727,891 1820,891 1820,777 1854,777
NetC233_1 on L1 (SIG/PWR) "NETC233_1_L01_P147" (solid, pour order 147): 1749.75,736.92 1899.25,736.92 1899.25,770 1800.84,770 1777.75,746.92 1749.75,746.92
+3V3_ANALOG on L1 (SIG/PWR) "NONET_L06_P-001" (solid, pour order 132): 1671,1442 1671,1395 1685,1381 1702,1381 1702,1409 1737,1409 1737,1362 1760,1362 1760,1442
GND on L1 (SIG/PWR) "NONET_L06_P-001" (solid, pour order 144): 1537,1430.43 1537,1496 1702,1496 1702,1561 1797,1561 1797,1509 1789,1501 1730,1501 1730,1449 1683,1449 1683,1432
ILIM_LDO+ on L1 (SIG/PWR) "NONET_L06_P-001" (solid, pour order 145): 1602,1534 1538,1534 1538,1506 1602,1506
+3V9 on L1 (SIG/PWR) "NONET_L06_P-001" (solid, pour order 143): 1651,1506 1651,1636 1797,1636 1797,1568 1695,1568 1695,1506 1666,1506
NetC217_1 on L1 (SIG/PWR) "NONET_L06_P-001" (solid, pour order 142): 1659,1272 1659,1355 1767,1355 1767,1449 1738,1449 1738,1494 1798,1494 1798,1272
+3V3_DIG on L1 (SIG/PWR) "+3V3_DIG_L01_P127" (solid, pour order 127): 1118,1017 1118,966 1124,960 1124,946 1109,946 1109,975 1109,1017 1116,1017
DVDD on L1 (SIG/PWR) "DVDD_L01_P097" (solid, pour order 97): 2057,670 2057,743 2027,743 2027,670
+3V3_DIG on L1 (SIG/PWR) "+3V3_DIG_L01_P077" (solid, pour order 77): 169,1238 169,1209 247,1209 247,1238 176,1238
+3V3_DIG on L1 (SIG/PWR) "+3V3_DIG_L01_P078" (solid, pour order 78): 171,589 171,540 300,540 300,589 173,589
EN_LDO+ on L1 (SIG/PWR) "EN_LDO+_L01_P065" (solid, pour order 65): 1641,1506 1641,1576 1621,1596 1559,1596 1559,1559 1615,1559 1631,1543 1631,1506
NetC223_1 on L1 (SIG/PWR) "NETC223_1_L01_P064" (solid, pour order 64): 1611,1421.5 1611,1272 1640,1272 1640,1374.5 1621,1393.5 1621,1421.5
+LED on L1 (SIG/PWR) "+LED_L01_P037" (solid, pour order 37): 207,1501 207,1345 229,1345 229,1501
SYS on L1 (SIG/PWR) "SYS_L01_P035" (solid, pour order 35): 505,1306 530,1331 580,1331 580,1293 494,1293 491,1296 458,1296 458,1306
NetC410_2 on L1 (SIG/PWR) "NETC410_2_L01_P034" (solid, pour order 34): 440,1334 450,1334 450,1353 510,1413 509,1413 485,1437 453,1405 453,1375 440,1362
NetC410_1 on L1 (SIG/PWR) "NETC410_1_L01_P033" (solid, pour order 33): 458,1316 502,1316 554,1368 529,1393 525,1393 458,1326
NetC411_1 on L1 (SIG/PWR) "NETC411_1_L01_P032" (solid, pour order 32): 400,1334 400,1366 388,1378 340,1378 340,1418 389,1418 389,1391 410,1370 410,1334
NetC411_2 on L1 (SIG/PWR) "NETC411_2_L01_P031" (solid, pour order 31): 430,1334 430,1366 443,1379 443,1419 398,1419 398,1392 420,1370 420,1334
GND on L1 (SIG/PWR) "NONET_L01_P155" (solid, shelved, pour order 155): 2032,5 ccw(c2040.86,124.71) 2160.89,122.95 958.05,122.95 946,135 946,380 1038,472 1038,518 1004,518 936,450 760,450 725,485 724.73,485 724.73,626 774.5,676.5 804,706 804,761 750.73,761 742,752.27 742,1338.73 1045.34,1642.07 2160,1642.07 2160,2042.91 ccw(c2042.42,2042.93) 2042.4,2160.51 122.95,2160.51 ccw(c122.93,2042.42) 4.84,2042.4 4.84,124 ccw(c123.99,123.99) 124,4.84 1036.16,4.84 1036,5
GND on L6 (SIG/PWR) "NONET_L06_P-001" (solid, pour order 228): 1690,1175 1605,1175 1605,1160 1690,1160 1690,1173
VDD_SPI on L6 (SIG/PWR) "VDD_SPI_L06_P128" (solid, pour order 128): 1453,1025 1453,918 1416,918 1416,1025
+3V3_DIG on L6 (SIG/PWR) "NONET_L06_P-001" (solid, pour order 227): 412,1926 560,1926 560,1891 412,1891
BOOT_BQ on L6 (SIG/PWR) "NONET_L06_P-001" (solid, pour order 208): 525,234 589,234 604,219 631,219 631,247 548,247 545,244 525,244
SYS on L6 (SIG/PWR) "NONET_L06_P-001" (solid, pour order 206): 436,293 436,323 447,334 449,334 449,438 450,438 506,494 506,656 407,656 407,293
GND on L6 (SIG/PWR) "NONET_L06_P-001" (solid, pour order 205): 446,142 446,183 456,183 456,142
GND on L6 (SIG/PWR) "NONET_L06_P-001" (solid, pour order 204): 446,317 446,255 476,255 476,317
SYS on L6 (SIG/PWR) "SYS_L06_P120" (solid, pour order 120): 1411,567 1379,599 1316,599 1316,667 1460,667 1460,455 1447,455 1447,501 1411,501
+3V3_DIG on L6 (SIG/PWR) "+3V3_DIG_L06_P011" (solid, pour order 11): 1221,491 1081,491 1081,392 1440,392 1440,491 1320,491
SW2_BB_3.3 on L6 (SIG/PWR) "SW2_BB_3.3_L06_P014" (solid, pour order 14): 1459,323 1447,323 1447,282 1421,256 1350,256 1350,53 1416,53 1435,72 1435,236 1459,260
SW1_BB_3.3 on L6 (SIG/PWR) "SW1_BB_3.3_L06_P015" (solid, pour order 15): 1466.49,324.33 1478.49,324.33 1478.49,283.33 1504.49,257.33 1575.49,257.33 1575.49,54.33 1509.49,54.33 1490.49,73.33 1490.49,237.33 1466.49,261.33
FB_BB_3.3 on L6 (SIG/PWR) "FB_BB_3.3_L06_P017" (solid, pour order 17): 1487,676 1570,676 1570,597 1516,597 1516,582 1512,578 1512,513 1498,499 1498,455 1487,454
NetC226_2 on L6 (SIG/PWR) "NETC226_2_L06_P016" (solid, pour order 16): 1569,487 1526,487 1526,546 1570,546 1570,488
NetC219_2 on L6 (SIG/PWR) "NETC219_2_L06_P109" (solid, pour order 109): 742,275 920,275 920,370 904,370 883,391 883,459 742,459 742,285
NetC221_2 on L6 (SIG/PWR) "NETC221_2_L06_P110" (solid, pour order 110): 673,545 795,545 795,467 673,467 673,535
VUSB on L6 (SIG/PWR) "VUSB_L06_P111" (solid, pour order 111): 526,273 526,304 572,350 606,350 614,358 614,459 734,459 734,339 614,339 548,273 544,273
PMID_BQ on L6 (SIG/PWR) "PMID_BQ_L06_P112" (solid, pour order 112): 526,263 552,263 586,297 629,297 629,254 574,254 526,254
SW_BQ on L6 (SIG/PWR) "SW_BQ_L06_P113" (solid, pour order 113): 518,318 541,341 541,419 508,419 508,398 459,398 459,350 486,323 486,294 518,294
BAT+ on L6 (SIG/PWR) "BAT+_L06_P115" (solid, pour order 115): 325,287 398,287 398,252 325,252
LDO_BQ on L6 (SIG/PWR) "LDO_BQ_L06_P116" (solid, pour order 116): 526,185 546,185 556,175 595,175 595,149 563,149 556,142 556,113 526,113
NetC216_1 on L6 (SIG/PWR) "NONET_L06_P-001" (solid, pour order 202): 1725,1688 1725,1576 1524,1576 1524,1751 1598,1751 1598,1711 1572,1711 1572,1609 1680,1609 1680,1660 1708,1688
SET_LDO- on L6 (SIG/PWR) "NONET_L06_P-001" (solid, pour order 201): 1727,1729 1727,1694 1733,1688 1733,1608 1771,1608 1771,1691 1746,1691 1738,1699 1738,1729
GND on L6 (SIG/PWR) "NONET_L06_P-001" (solid, pour order 200): 1634,1804 1634,1816 1623,1827 1550,1827 1550,1761 1603,1761 1603,1711 1625,1711 1625,1740 1665,1740 1665,1804
-3V3 on L6 (SIG/PWR) "NONET_L06_P-001" (solid, pour order 199): 1684,1694 1661,1671 1598,1671 1598,1625 1580,1625 1580,1702 1631,1702 1631,1729 1684,1729
+3V3_ANALOG on L6 (SIG/PWR) "+3V3_ANALOG_L06_P056" (solid, pour order 56): 1942,1118.2 1942,1198 1909,1198 1909,1118.2
PGFB_LDO- on L6 (SIG/PWR) "NONET_L06_P-001" (solid, pour order 161): 1727,1815 1727,1907 1751,1931 1787,1931 1787,1893 1768,1874 1768,1852 1738,1852 1738,1815
-3V3 on L6 (SIG/PWR) "L6 (SIG/PWR)--3V3" (solid, pour order 167): 2347,1103 2347,1089 2360,1089 2360,1032 2391,1032 2391,1103
ILIM_LDO- on L6 (SIG/PWR) "NONET_L06_P-001" (solid, pour order 162): 1745,1815 1809,1815 1809,1843 1745,1843
-3V9 on L6 (SIG/PWR) "NONET_L06_P-001" (solid, pour order 160): 1684,1815 1684,1902 1566,1902 1566,1834 1626,1834 1645,1815 1667,1815
NetR204_1 on L6 (SIG/PWR) "NETR204_1_L06_P107" (solid, pour order 107): 1154,2260 1154,2188 1202,2188 1202,2260 1165,2260
-3V9 on L6 (SIG/PWR) "-3V9_L06_P103" (solid, pour order 103): 1325,2182 1325,2099 957,2099 957,2182 1278,2182
NetC205_1 on L6 (SIG/PWR) "NETC205_1_L06_P108" (solid, pour order 108): 1323,2190 1323,2263 1253,2263 1253,2222 1213,2222 1213,2190
NetC201_2 on L6 (SIG/PWR) "NETC201_2_L06_P106" (solid, pour order 106): 1257,2310 1257,2512 1314,2512 1314,2310 1276,2310
NetC201_1 on L6 (SIG/PWR) "NETC201_1_L06_P104" (solid, pour order 104): 1025,2227 1141,2227 1141,2268 1247,2268 1247,2390 1209,2390 1209,2302 1025,2302
+3V9 on L6 (SIG/PWR) "+3V9_L06_P105" (solid, pour order 105): 1068,2311 1068,2426 1102,2426 1144,2468 1144,2511 1202,2511 1202,2311 1185,2311
+3V3_ANALOG on L6 (SIG/PWR) "+3V3_ANALOG_L06_P040" (solid, pour order 40): 2104,1464 2104,1540 2134,1540 2134,1464 2130,1464
-3V3 on L6 (SIG/PWR) "-3V3_L06_P044" (solid, pour order 44): 2046,999 2046,1072 2010,1072 2010,999
+3V3_ANALOG on L6 (SIG/PWR) "+3V3_ANALOG_L06_P042" (solid, pour order 42): 2261,1152 2288,1152 2288,1222 2261,1222
-3V3 on L6 (SIG/PWR) "-3V3_L06_P041" (solid, pour order 41): 2206,1339 2206,1416 2240,1416 2240,1339
+3V3_ANALOG on L6 (SIG/PWR) "+3V3_ANALOG_L06_P039" (solid, pour order 39): 2135.07,1583 2135.07,1651.55 2117.07,1669.55 2117.07,1699.55 2102.07,1714.55 2102.07,1736.55 2095,1736.55 2095,1583
-3V3 on L6 (SIG/PWR) "-3V3_L06_P038" (solid, pour order 38): 2020,1581 2020,1652 2038,1670 2038,1700 2052,1714 2052,1751 2060,1751 2060,1581
GND on L6 (SIG/PWR) "L6 (SIG/PWR)-GND" (solid, shelved, pour order 169): 2040.14,4.39 2041.95,4.39 ccw(c2041.95,122.95) 2160.51,122.95 2056.33,122.95 1762.05,122.95 1738,147 1621,264 1621,368 1232,368 1144,456 1063,456 1035,484 1035,553 915,553 915,476 1005,476 1005,402 1022,385 1042,385 1042,274 1144,274 1144,120 1103,120 1076.46,94 982,94 940,136 940,264 845,264 844.5,231.5 748,328 748,1323.22 905.71,1476 1406,1476 1418,1488 1418,1553 1448,1584 1617,1753 1707,1753 1707,1670 1714,1663 1755,1663 1807,1715 1807,1752.7 2160,1753 2160,2042.91 ccw(c2042.41,2042.92) 2042.4,2160.51 122.95,2160.51 ccw(c122.95,2042.41) 4.84,2042.4 4.84,124 ccw(c123.99,123.99) 123.56,4.84 2040.14,4.84
no net on Bottom Overlay "NONET_L06_P-001" (solid): -2636.97,481.12 ccw(c-2617.29,481.12) -2617.29,461.43 -2614.66,461.43 ccw(c-2616.02,482.48) -2594.97,481.12 ccw(c-2615.97,460.78)
GND on L2 (GND) "NONET_L06_P-001" (solid, pour order 218): 122.95,4.84 cw(c122.95,122.95) 4.84,122.95 4.84,2445.79 cw(c122.95,2445.79) 122.95,2563.9 2445.79,2563.9 cw(c2445.79,2445.79) 2563.9,2445.79 2563.9,122.95 cw(c2445.79,122.95) 2445.79,4.84
+3V3_DIG on L4 (PWR) "NONET_L06_P-001" (solid, pour order 223): 122.95,4.84 cw(c122.95,122.95) 4.84,122.95 4.84,2445.79 cw(c122.95,2445.79) 122.95,2563.9 1525.7,2563.9 1526.3,4.94
SYS on L4 (PWR) "NONET_L06_P-001" (solid, pour order 222): 444,632 444,480 518,480 518,632
-3V3 on L4 (PWR) "NONET_L06_P-001" (solid, pour order 212): 2304.69,1165.92 2350.69,1165.92 2350.69,1086.92 2304.69,1086.92 2304.69,1157.92
-3V3 on L4 (PWR) "NONET_L06_P-001" (solid, pour order 211): 1952.42,1134.03 1998.42,1134.03 1998.42,1055.03 1952.42,1055.03 1952.42,1126.03
-3V3 on L4 (PWR) "NONET_L06_P-001" (solid, pour order 210): 2149,1479 2195,1479 2195,1400 2149,1400 2149,1471
-3V3 on L4 (PWR) "NONET_L06_P-001" (solid, pour order 209): 2030,1814 2030,1749 2124,1749 2124,1814 2048,1814

## Silkscreen, mask and mechanical layers (free items; w line width, h text height)
Top Overlay:
  drawing of 2 lines, arcs and shapes, not listed
  text "BOOT" at -2695.12,36.73 h19.68
Bottom Overlay:
  drawing of 32 lines, arcs and shapes, not listed
  text "POWER" at -2607.39,593.63 h18.35 r90
Mechanical 1:
  the board outline again, w10

## Text inside footprints (layer, text, board x,y; h text height)
J201: Mechanical 13 "PCB EDGE" at 728.75,12.19 h32